# Altium PCB PCB.PcbDoc
Units mm, origin at the board's own origin, x right, y up, seen from the top; angles counter-clockwise.
Board outline 100 x 58 mm, 2 copper layers (Top Layer, Bottom Layer); 42 components, 47 nets, 196 pads, 115 vias.
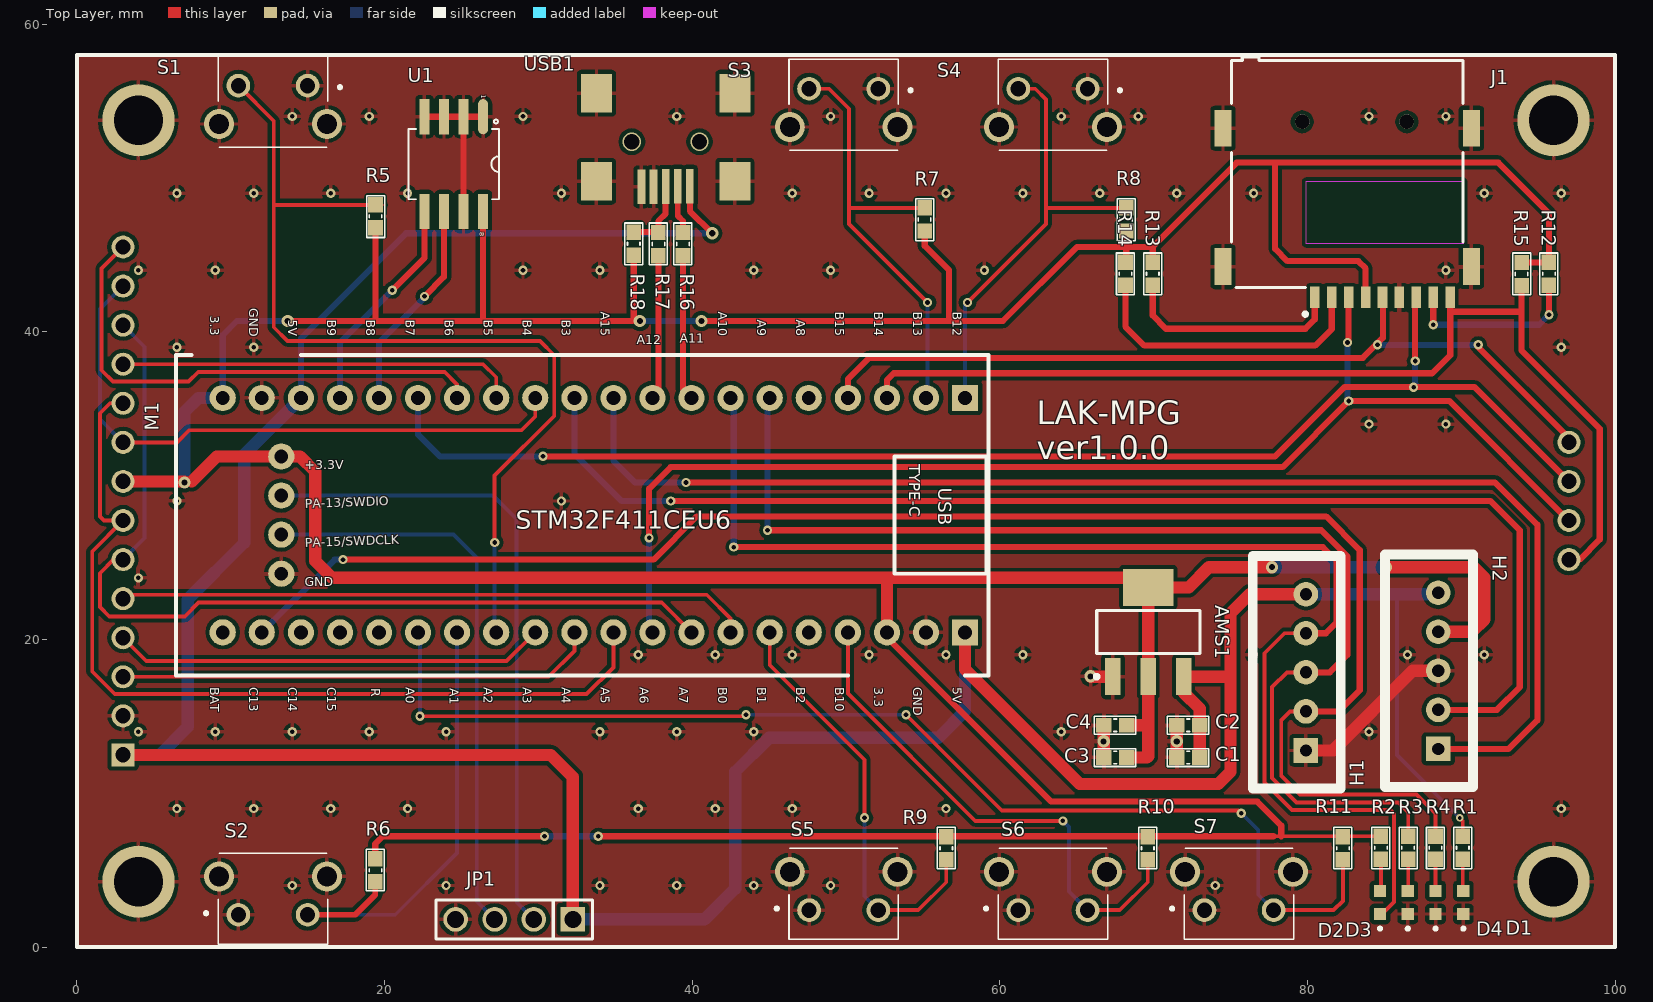
[diagram p0: Top Layer view]
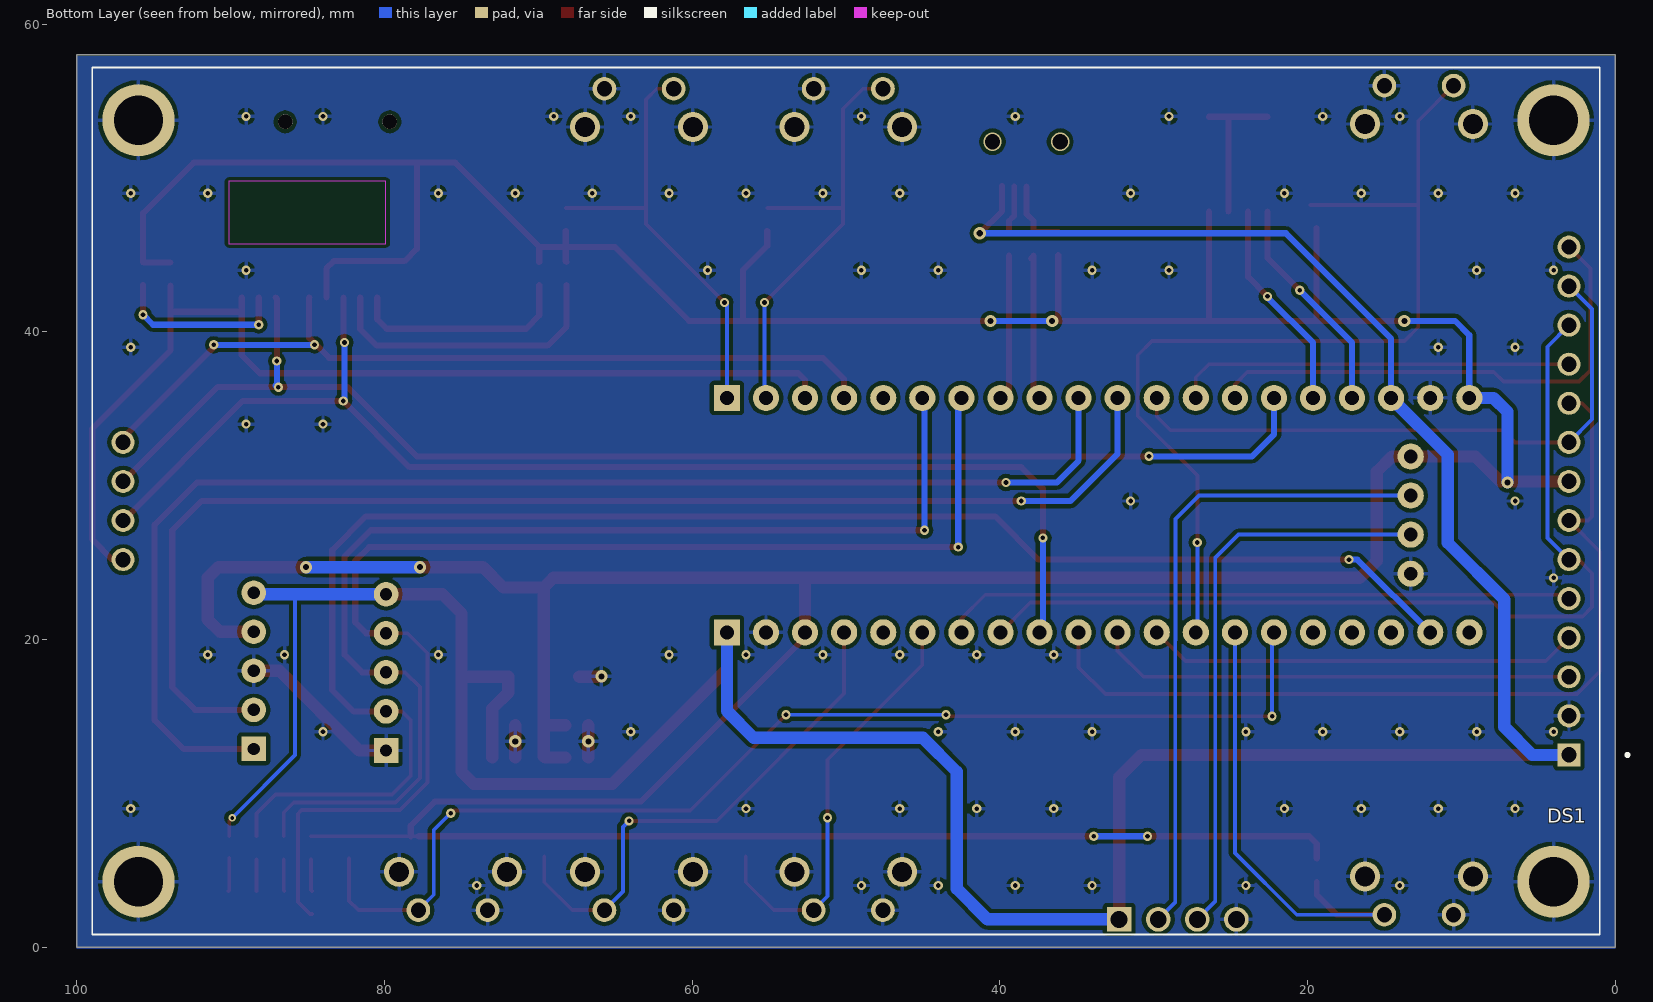
[diagram p1: Bottom Layer view, seen from below]
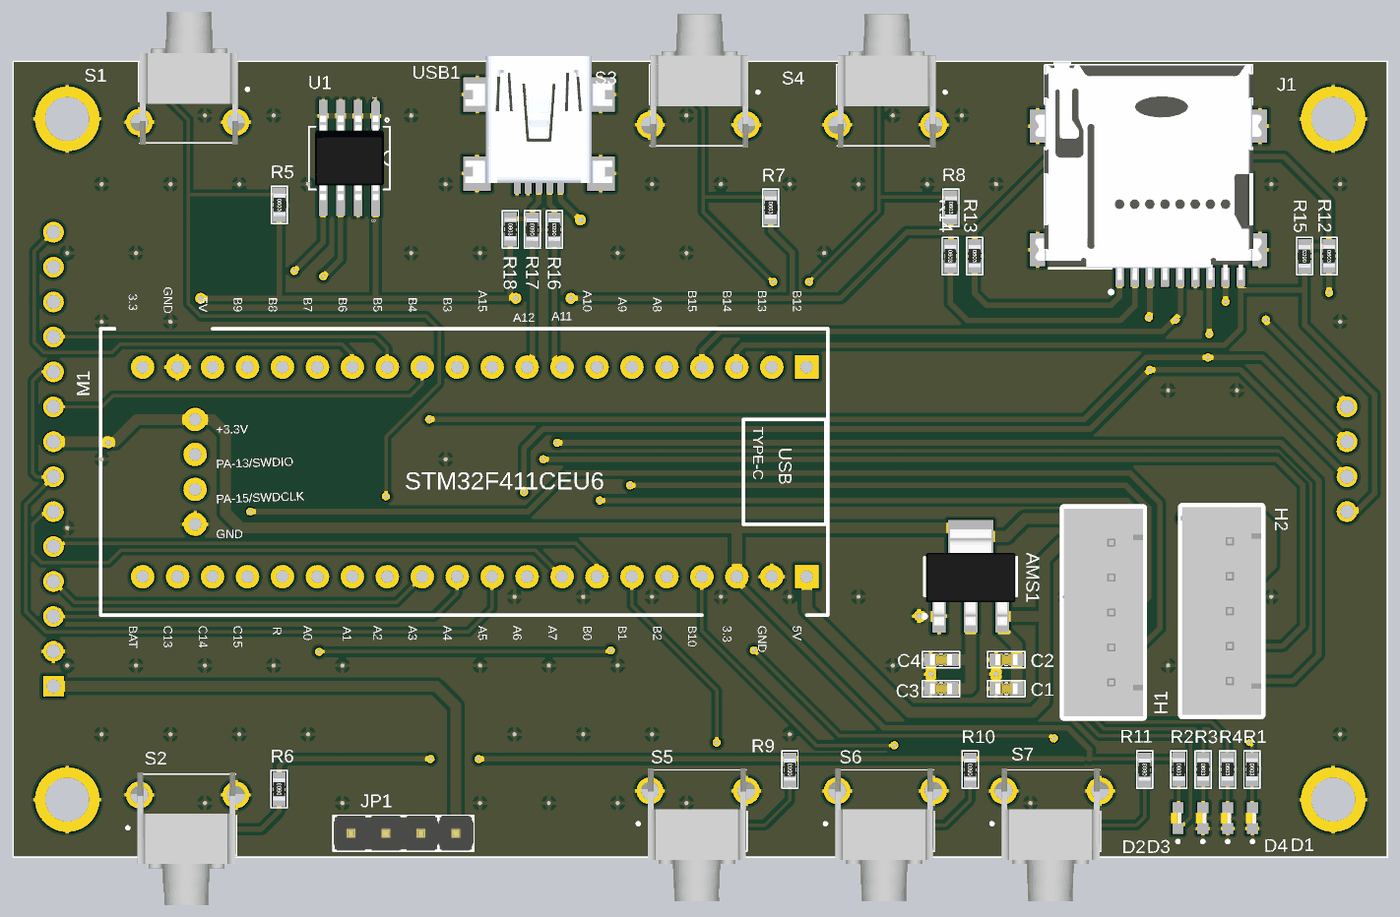
[diagram p2: 3D render of the assembled board from above, using the file's embedded part models]

## Layer stack, top to bottom
Top Solder: solder mask 0.0102, Solder Resist, Dk 3.5
Top Layer: signal copper 0.0356
Dielectric 1: dielectric 0.32, FR-4, Dk 4.8
Bottom Layer: signal copper 0.0356
Bottom Solder: solder mask 0.0102, Solder Resist, Dk 3.5

## Board outline
0,0 0,58 100,58 100,0

## Design rules (kind name [scope] priority, off if disabled: settings)
Clearance [All] p1: gap=0.254 ignorepadtopadclearanceinfootprint=FALSE except(0: Arc-Hole Track-Hole SMDPad-Hole THPad-Hole Via-Hole Fill-Hole Poly-Hole Region-Hole Text-Hole)
DiffPairsRouting [All] p1: maxlimit=0.254 minlimit=0.254 mostfreqgap=0.254 toplayer_minwidth=0.381 toplayer_maxwidth=0.381 toplayer_prefwidth=0.381 bottomlayer_minwidth=0.381 bottomlayer_maxwidth=0.381 bottomlayer_prefwidth=0.381 maxuncoupledlength=12.7
PolygonConnect [All] p1: connectstyle=Relief reliefconductorwidth=0.254 reliefentries=4 polygonreliefangle="90 Angle" airgapwidth=0.254
RoomDefinition Schematic [InComponentClass('Schematic')] p1: confinementstyle=ConfineIn formatcopy=TRUE lockcomponents=FALSE outline 152.943,1.051 181.01,1.051 181.01,56.931 152.943,56.931
RoutingVias [All] p1: holewidth=0.3 width=0.6 viastyle="Through Hole" minholewidth=0.25 minwidth=0.5 maxholewidth=0.4 maxwidth=0.8
SolderMaskExpansion [All] p1: expansion=0.102
Width [All] p1: maxlimit=0.8 minlimit=0.25 preferedwidth=0.4 minimp=50.000000 maximp=50.000000 favimp=50.000000
29 further rules are at their usual default settings.

## Classes and differential pairs
differential pair D: +D_P -D_N
differential pair D1: +D1_P -NetR16_2

## Components (designator, comment, footprint, x,y, rotation, side; value= is the part's Value field where it differs from the comment)
AMS1 "AMS1117-3.3V" SOT223 69.65,20.481 r0 top value="AMS1117-3.3V SOT223"
C1 "106" "tu 0603" 72.25,12.321 r180 top
C2 "104" "tu 0603" 72.25,14.421 r180 top
C3 "106" "tu 0603" 67.5,12.321 r180 top
C4 "104" "tu 0603" 67.5,14.421 r180 top
D1 "VLMO1300-GS08" LED_VLMO1300-GS08 90.134,2.9 r270 top
D2 "VLMO1300-GS08" LED_VLMO1300-GS08 84.716,2.9 r270 top
D3 "VLMO1300-GS08" LED_VLMO1300-GS08 86.522,2.9 r270 top
D4 "VLMO1300-GS08" LED_VLMO1300-GS08 88.328,2.9 r270 top
DS1 "DLS24035B" LCD_DLS24035B 50,29 r90 bottom
H1 "Header 5P 2.54 Duc Thang" XH2.54M-5 79.9,12.78 r90 top
H2 "Header 5P 2.54 Duc Thang" XH2.54M-5 88.5,12.88 r90 top
J1 "MEM2075-00-140-01-A" GCT_MEM2075-00-140-01-A 83.058,53.65 r180 top
JP1 "JP 1x4 2.54" "JP 1x4 DT" 32.24,1.8 r180 top
M1 "STM32F411CEU6 WEACT BLACK PILL V3.0" STM32F411CEU6BP 32.848,28.473 r270 top
R1 "330R" "tro smd 0603" 90.094,6.45 r270 top
R2 "330R" "tro smd 0603" 84.776,6.45 r270 top
R3 "330R" "tro smd 0603" 86.548,6.45 r270 top
R4 "330R" "tro smd 0603" 88.321,6.45 r270 top
R5 "1k" "tro smd 0603" 19.416,47.5 r270 top
R6 "1k" "tro smd 0603" 19.4,5 r90 top
R7 "1k" "tro smd 0603" 55.116,47.3 r270 top
R8 "1k" "tro smd 0603" 68.216,47.3 r270 top
R9 "1k" "tro smd 0603" 56.516,6.425 r90 top
R10 "1k" "tro smd 0603" 69.616,6.425 r90 top
R11 "1k" "tro smd 0603" 82.3,6.425 r90 top
R12 "10k" "tro smd 0603" 95.695,43.775 r270 top
R13 "10k" "tro smd 0603" 69.942,43.775 r270 top
R14 "10k" "tro smd 0603" 68.169,43.775 r270 top
R15 "1k" "tro smd 0603" 93.922,43.75 r90 top
R16 "0R" "tro smd 0603" 39.4,45.7 r90 top
R17 "0R" "tro smd 0603" 37.8,45.7 r90 top
R18 "1.5k" "tro smd 0603" 36.2,45.725 r270 top
S1 "FSMRA4JH04" FSMRA4JH04 15,56 r180 top
S2 "FSMRA4JH04" FSMRA4JH04 10.5,2.1 r0 top
S3 "FSMRA4JH04" FSMRA4JH04 52.1,55.8 r180 top
S4 "FSMRA4JH04" FSMRA4JH04 65.705,55.8 r180 top
S5 "FSMRA4JH04" FSMRA4JH04 47.6,2.4 r0 top
S6 "FSMRA4JH04" FSMRA4JH04 61.205,2.4 r0 top
S7 "FSMRA4JH04" FSMRA4JH04 73.3,2.4 r0 top
U1 "MB85RC256VP" SOIC8_50_328_25X90_SMT 24.5,50.9 r270 top
USB1 "USB Mini 5p SMD" "USB Mini 5p SMD" 38.2,52.9 r0 top

## Footprints (in the part's own frame and the unit in brackets; to place one, negate y for a bottom-side part, rotate by r counter-clockwise, add the part's x,y. Pads: shape width x height; smd on the part's side, far side on the other; paste and mask are expansions set on the pad)
FSMRA4JH04 [mm]
  round 1.54 hole 0.99: 1(0,0) 2(4.5,0)
  round 1.95 hole 1.3: 3(5.755,2.49) 4(-1.255,2.49)
  silkscreen extent -2.2,-1.91 5.8,4.01, body extent -2.05,-5.54 6.36,4.12, height 7.01
GCT_MEM2075-00-140-01-A [mm]
  rect 0.62x1.4 smd paste+0 mask+0.102: P1(2.58,11.42) P2(1.48,11.42) P3(0.38,11.42) P4(-0.72,11.42) P5(-1.82,11.42) P6(-2.92,11.42) P7(-4.02,11.42) P8(-5.12,11.42) P9(-6.22,11.42)
  rect 1.1x2.4 smd paste+0 mask+0.102: SH1(-7.6,0.42) SH2(-7.6,9.42) SH3(8.55,9.42) SH4(8.55,0.42)
  round 0.95 hole 0.95 unplated mask+0: ""(-3.4,0) ""(3.4,0)
  Keep-Out Layer region: 3.15,3.874 -7.057,3.874 -7.057,7.92 3.15,7.92
  silkscreen extent -7.05,-4.23 8,12.62, body extent -7.74,-4.25 8.7,11.6, height 1.45
"JP 1x4 DT" [mm] "4 pins, 1 row, straight, gold plating"
  rect 1.6x1.6 hole 1.1: 1(0,0)
  round 1.6 hole 1.1: 2(2.54,0) 3(5.08,0) 4(7.62,0)
  silkscreen extent -1.27,-1.27 8.89,1.27, body extent -1.27,-1.27 8.89,1.27, height 8.54
LCD_DLS24035B [mm]
  rect 1.5x1.5 / inner round 1.5 / far side rect 1.5x1.5 hole 1 mask+0.102: J2_1(-16.51,-47)
  round 1.5 hole 1 mask+0.102: J2_2(-13.97,-47) J2_3(-11.43,-47) J2_4(-8.89,-47) J2_5(-6.35,-47) J2_6(-3.81,-47) J2_7(-1.27,-47) J2_8(1.27,-47) J2_9(3.81,-47) J2_10(6.35,-47) J2_11(8.89,-47) J2_12(11.43,-47) J2_13(13.97,-47) J2_14(16.51,-47) J4_1(-3.81,47) J4_2(-1.27,47) J4_3(1.27,47) J4_4(3.81,47)
  round 4.7 hole 3.2 mask+0.102: SH1(-24.75,-46) SH2(24.75,-46) SH3(-24.75,46) SH4(24.75,46)
  silkscreen extent -28.17,-50.9 28.17,49
LED_VLMO1300-GS08 [mm]
  rect 0.8x0.8 smd paste+0 mask+0.102: A(-0.75,0) C(0.75,0)
  silkscreen extent 1.6,-0.1 1.8,0.1, body extent -0.4,-0.52 0.4,0.26, height 1.65
SOIC8_50_328_25X90_SMT [mil] "SOIC"
  oval 90x25 smd mask+3: 1(-121.32,75)
  rect 90x25 smd mask+3: 2(-121.32,25) 3(-121.32,-25) 4(-121.32,-75) 5(121.32,-75) 6(121.32,-25) 7(121.32,25) 8(121.32,75)
  silkscreen extent -114,-116 90,116, body extent -121,-98 121,98, height 79
SOT223 [mm]
  rect 1x2.4 smd: 1(-2.3,-2.9) 2(0,-2.9) 3(2.3,-2.9)
  rect 3.3x2.4 smd: 4(0,2.9)
  silkscreen extent -3.47,-3.02 3.35,1.4, body extent -3.25,-3.56 3.25,3.4, height 1.68
STM32F411CEU6BP [mm]
  rect 1.7x1.7 hole 0.9 paste+0 mask+0.102: 1(-7.227,24.892) 40(8.013,24.892)
  round 1.7 hole 0.9 paste+0 mask+0.102: 2(-7.227,22.352) 3(-7.227,19.812) 4(-7.227,17.272) 5(-7.227,14.732) 6(-7.227,12.192) 7(-7.227,9.652) 8(-7.227,7.112) 9(-7.227,4.572) 10(-7.227,2.032) 11(-7.227,-0.508) 12(-7.227,-3.048) 13(-7.227,-5.588) 14(-7.227,-8.128) 15(-7.227,-10.668) 16(-7.227,-13.208) 17(-7.227,-15.748) 18(-7.227,-18.288) 19(-7.227,-20.828) 20(-7.227,-23.368) 21(8.013,-23.368) 22(8.013,-20.828) 23(8.013,-18.288) 24(8.013,-15.748) 25(8.013,-13.208) 26(8.013,-10.668) 27(8.013,-8.128) 28(8.013,-5.588) 29(8.013,-3.048) 30(8.013,-0.508) 31(8.013,2.032) 32(8.013,4.572) 33(8.013,7.112) 34(8.013,9.652) 35(8.013,12.192) 36(8.013,14.732) 37(8.013,17.272) 38(8.013,19.812) 39(8.013,22.352) 41(-3.417,-19.558) 42(-0.877,-19.558) 43(1.663,-19.558) 44(4.203,-19.558)
  silkscreen extent -10.02,-26.42 10.81,26.42
"tro smd 0603" [mm] "Chip Capacitor, 2-Leads, Body 1,60x0,80mm, IPC Medium Density"
  rect 1x0.95 smd mask+0.076: 1(-0.75,0) 2(0.75,0)
  silkscreen extent -1.35,-0.58 1.37,0.58, body extent -0.82,-0.42 0.82,0.43, height 0.44
"tu 0603" [mm] "Chip Capacitor, 2-Leads, Body 1,60x0,80mm, IPC Medium Density"
  rect 1x0.95 smd mask+0.076: 1(-0.75,0) 2(0.75,0)
  silkscreen extent -1.35,-0.58 1.37,0.58, body extent -0.8,-0.4 0.8,0.4, height 0.9
"USB Mini 5p SMD" [mm]
  rect 0.5x2.25 smd: 1(1.651,-3.429) 2(0.864,-3.442) 3(0.076,-3.454) 4(-0.711,-3.467) 5(-1.499,-3.48)
  rect 2x2.5 smd: 5(-4.424,-3.124) 5(-4.42,2.616) 5(4.576,-3.124) 5(4.58,2.616)
  body extent -5.27,-3.8 5.43,5.4, height 3.95
XH2.54M-5 [mm]
  rect 1.6x1.6 hole 0.8: 1(0,0)
  round 1.6 hole 0.8: 2(2.54,0) 3(5.08,0) 4(7.62,0) 5(10.16,0)
  silkscreen extent -2.48,-2.26 12.64,3.46, body extent -2.48,-2.26 12.64,3.48, height 6.91

## Part data
AMS1: library part "AMS1117 SMD", "Dán", Chung_Loai=Dán, Don_Vi=Con, Ma_Hang=MH000596
C1 C3: library part "Tu 0603 106 16V 20%", "Dán", Chung_Loai=Dán, Don_Vi=Con, Ma_Hang=MH004848, So_Chan=2, Ten_Linh_Kien="T? 0603-10uF 20% 16V"
C2 C4: library part "Tu 0603 104 50V 10%", "Dán", Chung_Loai=Dán, Don_Vi=Con, Ma_Hang=MH004568, So_Chan=2, Ten_Linh_Kien="T? 0603 104-100nF 10% 50V"
D1 D2 D3 D4: "Orange 605nm LED Indication - Discrete 2V 0603 (1608 Metric)", Package="0603 Vishay", Check_prices=https://www.snapeda.com/parts/VLMO1300-GS08/Vishay+Semiconductor+Opto+Division/view-part/?ref=eda, MF=Vishay, MP=VLMO1300-GS08, SnapEDA_Link=https://www.snapeda.com/parts/VLMO1300-GS08/Vishay+Semiconductor+Opto+Division/view-part/?ref=snap
DS1: "3.5 Inch 480*320 SPI TFT LCD Module with ILI9488 Driver", Package=None, Check_prices=https://www.snapeda.com/parts/DLS24035B/Elecrow/view-part/?ref=eda, MF=Elecrow, MP=DLS24035B, SnapEDA_Link=https://www.snapeda.com/parts/DLS24035B/Elecrow/view-part/?ref=snap
H1 H2: "C?m", Chung_Loai=C?m, Don_Vi=Con, Ma_Hang=MH001298, Ten_Linh_Kien="Header 5P XH2.54-5P Ð?c Th?ng"
J1: "9 (8 + 1) Position Card Connector microSD Surface Mount, Right Angle Gold", Package=None, Check_prices=https://www.snapeda.com/parts/MEM2075-00-140-01-A/Global+Connector+Technology/view-part/?ref=eda, MF="Global Connector Technology", MP=MEM2075-00-140-01-A, SnapEDA_Link=https://www.snapeda.com/parts/MEM2075-00-140-01-A/Global+Connector+Technology/view-part/?ref=snap
JP1: library part "JP 1x4 2.54 Duc Thang", "C?m", Chung_Loai=C?m, Don_Vi=Con, Ma_Hang=MH000903, Ten_Linh_Kien="Jump Ðon Ð?c 2.54MM 1x40P Th?ng 11MM"
R1 R2 R3 R4: library part "Tro 0603 5% 330R", "Dán", Chung_Loai=Dán, Don_Vi=Con, Ma_Hang=MH006910, So_Chan=2, Ten_Linh_Kien="Tr? 0603 5% 330R"
R5 R6 R7 R8 R9 R10 R11 R15: library part "Tro 0603 1% 1k", "Dán", Chung_Loai=Dán, Don_Vi=Con, Ma_Hang=MH006334, So_Chan=2, Ten_Linh_Kien="Tr? 0603 1% 1k"
R12 R13 R14: library part "Tro 0603 1% 10k", "Dán", Chung_Loai=Dán, Don_Vi=Con, Ma_Hang=MH006333, So_Chan=2, Ten_Linh_Kien="Tr? 0603 1% 10k"
R16 R17: library part "Tro 0603 1% 0R", "Dán", Chung_Loai=Dán, Don_Vi=Con, Ma_Hang=MH005792, So_Chan=2, Ten_Linh_Kien="Tr? 0603 1% 0R"
R18: library part "Tro 0603 5% 1.5k", "Dán", Chung_Loai=Dán, Don_Vi=Con, Ma_Hang=MH006313, So_Chan=2, Ten_Linh_Kien="Tr? 0603 5% 1.5k"
S1 S2 S3 S4 S5 S6 S7: "Switch,Pushbutton, Tactile, Single Pole, 50mA,Right Angle", Package=None, Check_prices=https://www.snapeda.com/parts/FSMRA4JH04/TE+Connectivity/view-part/?ref=eda, MF="TE Connectivity", MP=FSMRA4JH04, SnapEDA_Link=https://www.snapeda.com/parts/FSMRA4JH04/TE+Connectivity/view-part/?ref=snap
U1: library part IC_MB85RC256VPF-G-JNERE2, "FRAM (Ferroelectric RAM) Memory IC 256Kb (32K x 8) I²C 1MHz 550ns 8-SOP", Alternate Part Number-1=NA, Case/Package=SOIC8, Manufacturer=Fujitsu, Manufacturer Part Number=MB85RC256VPF-G-JNERE2, Supplier Part Number-1=C126728, Supplier-1=LCSC
USB1: "USB Type B", Ma_Hang=MH001022, Ten="MiniUSB 5P SMD"

## Via types
v1: diameter 0.6, hole 0.3, Top Layer to Bottom Layer, 102 vias
v2: diameter 0.8, hole 0.4, Top Layer to Bottom Layer, 10 vias
v3: diameter 1.2, hole 1, Top Layer to Bottom Layer, 2 vias
v4: diameter 0.5, hole 0.25, Top Layer to Bottom Layer, 1 vias

## Nets (pads, with @x,y where several pads share a name; then routed paths per layer and width w, separated by ;. In a path a pad name is that pad's centre, name@x,y a point inside that pad or via, vN(x,y) a via of type N, cw(c..) or ccw(c..) an arc to the next point about the centre after c; other vN are vias at no path point)
3.3V: AMS1.2 AMS1.4 C3.1 C4.1 DS1.J2_8 H2.4 J1.P4 M1.20 M1.38 M1.41 R2.1 R5.2 R6.2 R7.2 R8.2 R9.2 R10.2 R11.2 R12.1 R13.1 R14.1 R15.2 R18.2 U1.8 | length 367.3
  Top Layer w0.25: 77.8,7.2 78.3,7.2 R2.1
  Top Layer w0.4: v2(13.7,40.7) 19.416,40.7 ; R6.2 19.4,6.7 19.9,7.2 v1(30.4,7.2) ; R5.2 19.416,40.7 ; U1.8 26.405,40.795 26.5,40.7 ; v1(33.9,7.2) 77.8,7.2 ; R18.2 36.2,40.8 36.1,40.7 26.5,40.7 ; v2(40.6,40.7) 56.7,40.7 ; M1.38 52.66,20.14 63.342,9.458 76.742,9.458 78.3,7.9 78.3,7.2 ; R7.2 55.116,45.584 56.7,44 56.7,40.7 ; R14.1 68.216,44.573 68.216,45.51 ; R8.2 68.216,45.51 ; R13.1 69.942,45.542 ; J1.P4 83.778,44.122 83.3,44.6 78.7,44.6 77.9,45.4 77.9,51 ; R15.2 95.67,44.5 R12.1 95.695,47.705 92.4,51 77.9,51 ; 19.416,40.7 26.5,40.7 ; 56.7,40.7 60.2,40.7 65.01,45.51 68.216,45.51 ; 68.216,45.51 69.91,45.51 69.942,45.542 ; 69.942,45.542 75.4,51 77.9,51
  Top Layer w0.8: DS1.J2_8 v2@7,30.27 ; 7.47,30.27 9.09,31.89 M1.41 14.51,31.89 15.5,30.9 15.5,25.1 16.6,24 52.66,24 ; M1.38 52.66,24 ; C3.1 69.571,12.321 69.65,12.4 69.65,14.4 ; C4.1 69.629,14.421 69.65,14.4 ; v2(77.7,24.7) 73.6,24.7 72.281,23.381 AMS1.4 ; v2(85.1,24.7) 90.8,24.7 91.5,24 91.5,21.3 90.7,20.5 H2.4 ; 52.66,24 69.031,24 AMS1.4 ; 69.65,14.4 AMS1.2 AMS1.4
  Bottom Layer w0.4: M1.20 9.48,39.78 10.4,40.7 v2(13.7,40.7) ; v1(30.4,7.2) v1(33.9,7.2) ; v2(36.6,40.7) v2(40.6,40.7)
  Bottom Layer w0.8: v2(7,30.2) 7,34.8 7.9,35.7 M1.20 ; v2(77.7,24.7) v2(85.1,24.7)
5V: AMS1.3 C1.1 C2.1 DS1.J2_1 H1.5 H2.5 JP1.1 M1.18 M1.40 R1.1 USB1.1 | length 220.2
  Top Layer w0.25: v4(89.9,8.4) 90.094,8.206 R1.1
  Top Layer w0.4: USB1.1 39.851,47.849 v2(41.3,46.4)
  Top Layer w0.8: DS1.J2_1 30.81,12.49 32.24,11.06 JP1.1 ; M1.40 57.74,18.06 65.2,10.6 74.2,10.6 75,11.4 75,17.7 ; C1.1 C2.1 73,15.5 71.95,16.55 AMS1.3 74.881,17.581 75,17.7 ; H1.5 76.24,22.94 75,21.7 75,17.7
  Bottom Layer w0.25: 86.2,22.94 85.821,22.561 85.821,12.479 v4(89.9,8.4)
  Bottom Layer w0.4: M1.18 14.56,39.56 21.4,46.4 v2(41.3,46.4)
  Bottom Layer w0.8: DS1.J2_1 5.39,12.49 7.2,14.3 7.2,22.6 10.88,26.28 10.88,32.02 M1.18 ; JP1.1 40.8,1.8 42.8,3.8 42.8,11.4 45,13.6 56,13.6 57.74,15.34 M1.40 ; H1.5 86.2,22.94 88.4,22.94 H2.5
A: H2.1 M1.10 | length 85.8
  Top Layer w0.4: v1(39.6,30.2) 92.2,30.2 94.946,27.454 94.946,14.746 93.08,12.88 H2.1
  Bottom Layer w0.4: M1.10 34.88,31.62 36.3,30.2 v1(39.6,30.2)
B: H2.2 M1.11 | length 83.3
  Top Layer w0.4: v1(38.6,29) 38.608,29.008 91.892,29.008 93.8,27.1 93.8,16.9 92.32,15.42 H2.2
  Bottom Layer w0.4: M1.11 32.34,32.06 35.4,29 v1(38.6,29)
CD: DS1.J4_1 J1.P9 M1.3 R15.1 | length 68
  Top Layer w0.4: M1.3 52.66,36.86 53.1,37.3 88.1,37.3 89.278,38.478 89.278,41.3 ; J1.P9 89.278,41.3 ; R15.1 93.922,41.3 ; DS1.J4_1 97.69,25.19 99,26.5 99,33.7 93.922,38.778 93.922,41.3 ; 89.278,41.3 93.922,41.3
CK: DS1.J4_4 J1.P5 M1.4 | length 55.2
  Top Layer w0.4: M1.4 50.12,36.92 51.5,38.3 83.6,38.3 v1@84.55,39.25 ; v1(84.55,39.15) v1@84.55,39.25 ; J1.P5 84.9,42.208 84.9,39.6 v1@84.55,39.25 ; v1(91.1,39.15) 91.1,39 97,33.1 DS1.J4_4
  Bottom Layer w0.4: v1(84.55,39.15) v1(91.1,39.15)
CMD: DS1.J4_2 J1.P3 M1.32 | length 81.6
  Top Layer w0.4: v1(37.2,26.6) 37.2,29.8 38.6,31.2 78.378,31.2 v1(82.678,35.5) 89.23,35.5 DS1.J4_2 ; v1(82.6,39.3) 82.678,39.378 J1.P3
  Bottom Layer w0.4: v1(37.2,26.6) 37.2,20.68 M1.32 ; v1(82.6,39.3) 82.6,35.578 v1(82.678,35.5)
D0: DS1.J4_3 J1.P7 M1.15 | length 88.2
  Top Layer w0.4: v1(30.3,31.9) 77.9,31.9 82.4,36.4 v1(86.9,36.4) 90.87,36.4 DS1.J4_3 ; v1(87,38.1) 87,42.152 J1.P7
  Bottom Layer w0.4: M1.15 22.18,33.32 23.6,31.9 v1(30.3,31.9) ; v1(86.9,36.4) 86.978,36.4 87.078,36.5 87,36.578 v1(87,38.1)
D1_P: R17.2 R18.1 USB1.3 | length 4.8
  Top Layer w0.381: R18.1 37.775,46.475 R17.2 37.8,47.2 38.276,47.676 USB1.3
D_N: M1.8 R16.1 | length 9.5
  Top Layer w0.381: R16.1 39.4,36.26 M1.8
D_P: M1.9 R17.1 | length 9.7
  Top Layer w0.381: M1.9 37.8,36.08 R17.1 R17.1@37.99,44.76
GND: AMS1.1 C1.2 C2.2 C3.2 C4.2 D1.C D3.C D4.C DS1.J2_2 DS1.SH1 DS1.SH2 DS1.SH3 DS1.SH4 H1.1 H2.3 J1.P6 J1.SH1 J1.SH2 J1.SH3 J1.SH4 JP1.4 M1.19 M1.39 M1.44 S1.1 S1.3 S1.4 S2.1 S2.3 S2.4 S3.1 S3.3 S3.4 S4.1 S4.3 S4.4 S5.1 S5.3 S5.4 S6.1 S6.3 S6.4 S7.1 S7.3 S7.4 U1.1 U1.2 U1.3 U1.4 U1.7 USB1.4 USB1.5 | length 26.4
  Top Layer w0.4: U1.4 U1.1 ; U1.7 U1.2
  Top Layer w0.8: v2(65.9,17.6) 65.919,17.581 AMS1.1 ; C3.2 v2(66.75,13.371) C4.2 ; C1.2 v2(71.5,13.371) C2.2 ; H1.1 81.658,12.78 86.838,17.96 H2.3
  other v1: 14,4 24,4 34,4 39,4 44,4 49,4 74,4 6.5,9 11.5,9 16.5,9 21.5,9 36.5,9 41.5,9 46.5,9 56.5,9 96.5,9 4,14 9,14 14,14 19,14 24,14 34,14 39,14 44,14 64,14 84,14 36.5,19 41.5,19 46.5,19 51.5,19 56.5,19 61.5,19 76.5,19 86.5,19 91.5,19 4,24 6.5,29 31.5,29 84,34 89,34 6.5,39 11.5,39 96.5,39 4,44 9,44 29,44 34,44 44,44 49,44 59,44 89,44 6.5,49 11.5,49 16.5,49 21.5,49 31.5,49 46.5,49 51.5,49 56.5,49 61.5,49 66.5,49 71.5,49 76.5,49 91.5,49 96.5,49 14,54 19,54 29,54 39,54 49,54 64,54 69,54 84,54 89,54
L-BTN: M1.27 R6.1 S2.2 | length 31.5
  Top Layer w0.381: S2.2 18.1,2.1 19.4,3.4 R6.1
  Bottom Layer w0.25: S2.2 20.7,2.1 24.72,6.12 M1.27
LD-BTN: M1.35 R9.1 S5.2 | length 27.8
  Top Layer w0.25: M1.35 45.04,18.34 51.2,12.18 v1(51.2,8.4) ; S5.2 54.7,2.4 56.516,4.216 R9.1 R9.1@56.516,5.9
  Bottom Layer w0.25: v1(51.2,8.4) 51.2,3.3 S5.2
LU-BTN: M1.37 R10.1 S6.2 | length 34.2
  Top Layer w0.25: M1.37 50.12,16.48 58.404,8.196 64.096,8.196 v1(64.1,8.2) ; S6.2 67.8,2.4 69.616,4.216 R10.1 R10.1@69.616,5.9
  Bottom Layer w0.25: v1(64.1,8.2) 64.5,7.8 64.5,3.605 S6.2
MPG_EN: H1.2 M1.22 R4.1 | length 106.6
  Top Layer w0.25: H1.2 78.87,15.32 78.3,14.75 78.3,11.113 79.505,9.908 87.1,9.908 88.321,8.687 R4.1
  Top Layer w0.4: v1(17.3,25.19) 37.49,25.19 40.3,28 81.21,28 83.4,25.81 83.4,16.7 82.02,15.32 H1.2
  Bottom Layer w0.4: M1.22 16.75,25.19 v1(17.3,25.19)
NetD1_A: D1.A R1.2 | length 2.2
  Top Layer w0.25: R1.2@90.094,5.8 90.094,3.69 D1.A
NetD2_A: D2.A R2.2 | length 2.1
  Top Layer w0.25: D2.A 84.776,3.71 R2.2
NetD3_A: D3.A R3.2 | length 2.1
  Top Layer w0.25: D3.A 86.548,3.677 R3.2
NetD4_A: D4.A R4.2 | length 2.1
  Top Layer w0.25: R4.2 88.321,3.657 D4.A
NetJ1_P1: J1.P1 R13.2 | length 14.5
  Top Layer w0.4: R13.2 69.942,41.058 70.8,40.2 79.87,40.2 80.478,40.808 J1.P1
NetJ1_P2: J1.P2 R14.2 | length 19.1
  Top Layer w0.4: R14.2 68.169,40.331 69.4,39.1 80.5,39.1 81.578,40.178 J1.P2
NetJ1_P8: J1.P8 R12.2 | length 11.5
  Top Layer w0.4: v1(88.178,40.452) J1.P8 ; R12.2 95.7,43.021 v1(95.7,41.1)
  Bottom Layer w0.4: v1(88.178,40.452) 95.052,40.452 v1(95.7,41.1)
NetR16_2: R16.2 USB1.2 | length 3.1
  Top Layer w0.381: USB1.2 39.064,47.536 39.4,47.2 R16.2
PA0: M1.26 R11.1 S7.2 | length 76.4
  Top Layer w0.25: v1(22.3,15) 43.4,15 v1(43.5,15.1) ; v1(53.9,15.1) 60.121,8.879 75.521,8.879 v1(75.7,8.7) ; S7.2@77.701,2.499 S7.2 81.7,2.4 82.3,3 R11.1 R11.1@82.3,5.75
  Bottom Layer w0.25: M1.26 22.3,20.34 v1(22.3,15) ; v1(43.5,15.1) v1(53.9,15.1) ; v1(75.7,8.7) 76.8,7.6 76.8,3.4 S7.2
PA2: M1.28 R5.1 S1.2 | length 62.3
  Top Layer w0.25: S1.2 12.8,53.7 12.8,48.2 ; R5.1@19.816,48.25 R5.1 12.85,48.25 12.8,48.2 ; v1(27.16,26.3) 27.16,30.66 31.029,34.529 31.029,38.471 30.1,39.4 13.69,39.4 12.8,40.29 12.8,48.2
  Bottom Layer w0.25: v1(27.16,26.3) 27.16,20.56 M1.28
PA3: DS1.J2_4 M1.29 | length 28.2
  Top Layer w0.25: DS1.J2_4 4.51,18.6 27.94,18.6 M1.29
PA4: DS1.J2_3 M1.30 | length 31.3
  Top Layer w0.25: DS1.J2_3 30.67,17.57 32.34,19.24 M1.30
PA5: DS1.J2_7 DS1.J2_10 M1.31 | length 58.2
  Top Layer w0.25: DS1.J2_10 2.15,35.35 1.5,34.7 1.5,28 1.77,27.73 DS1.J2_7 0.996,25.726 0.996,17.904 2.459,16.441 33.141,16.441 34.88,18.18 M1.31
PA7: DS1.J2_6 DS1.J2_12 M1.33 | length 60.4
  Top Layer w0.25: DS1.J2_6 2.39,25.19 1.5,24.3 1.5,22.1 2.1,21.5 7.011,21.5 7.907,22.396 38.024,22.396 M1.33
  Bottom Layer w0.25: DS1.J2_6 4.4,26.59 4.4,39.03 DS1.J2_12
PA8: M1.5
PA9: H1.3 M1.6 R3.1 | length 76.5
  Top Layer w0.25: H1.3 78.66,17.86 77.704,16.904 77.704,10.996 79.296,9.404 85.9,9.404 86.548,8.756 R3.1
  Top Layer w0.4: v1(44.9,27.1) 80.9,27.1 82.6,25.4 82.6,19 81.46,17.86 H1.3
  Bottom Layer w0.4: v1(44.9,27.1) 44.9,35.56 M1.6
PA10: D2.C H1.4 M1.7 | length 83.5
  Top Layer w0.25: H1.4 78.5,20.4 77.2,19.1 77.2,10.7 79,8.9 85.4,8.9 85.63,8.67 85.63,2.93 84.85,2.15 D2.C
  Top Layer w0.4: v1(42.7,26) 81,26 81.9,25.1 81.9,21.1 81.2,20.4 H1.4
  Bottom Layer w0.4: M1.7 42.7,35.5 v1(42.7,26)
PA13: JP1.2 M1.42 | length 43.2
  Top Layer w0.25: JP1.2@29.749,2.351 JP1.2@30.3,1.8
  Bottom Layer w0.25: M1.42 27.05,29.35 28.571,27.829 28.571,19.951 28.6,19.922 28.6,2.9 JP1.2
PA14: JP1.3 M1.43 | length 37.4
  Top Layer w0.25: JP1.3 JP1.3@27.229,1.869
  Bottom Layer w0.25: M1.43 24.49,26.81 26,25.3 26,2.96 JP1.3
PB0: DS1.J2_5 M1.34 | length 41.1
  Top Layer w0.25: DS1.J2_5 3.25,22.9 40.95,22.9 42.5,21.35 M1.34
PB2: M1.36
PB4: DS1.J2_9 DS1.J2_13 M1.12 | length 40.1
  Top Layer w0.25: DS1.J2_9 6.51,32.81 7.3,33.6 28.9,33.6 29.8,34.5 M1.12
  Bottom Layer w0.25: DS1.J2_9 1.5,34.31 1.5,41.47 DS1.J2_13
PB5: DS1.J2_11 M1.13 | length 26
  Top Layer w0.25: DS1.J2_11 26.41,37.89 27.26,37.04 M1.13
PB6: DS1.J2_14 M1.14 | length 33.5
  Top Layer w0.25: DS1.J2_14 1.6,44.11 1.6,37.5 2.339,36.761 7.261,36.761 7.886,37.386 23.914,37.386 24.72,36.58 M1.14
PB8: M1.16 U1.6 | length 13.9
  Top Layer w0.381: U1.6@23.865,47 U1.6
  Top Layer w0.4: v1(22.6,42.3) 23.865,43.565 U1.6@23.865,47
  Bottom Layer w0.4: M1.16 19.64,39.292 22.6,42.252 v1(22.6,42.3)
PB9: M1.17 U1.5 | length 14.4
  Top Layer w0.381: U1.5@22.595,46.9 U1.5
  Top Layer w0.4: v1(20.5,42.7) 22.595,44.795 U1.5@22.595,46.9
  Bottom Layer w0.4: M1.17 17.1,39.3 v1(20.5,42.7)
PB12: M1.1 R8.1 S4.2 | length 29
  Top Layer w0.25: v1(57.9,41.9) 63,47 63,48.05 ; S4.2 62.3,55.8 63,55.1 63,48.1 ; R8.1 63.05,48.05 ; 63,48.05 63.05,48.05 ; 63,48.05 63,48.1 ; 63,48.1 63.05,48.05
  Bottom Layer w0.25: M1.1 57.74,41.74 v1(57.9,41.9)
PB13: M1.2 R7.1 S3.2 | length 29
  Top Layer w0.25: S3.2 48.9,55.8 50.2,54.5 50.2,48.1 ; R7.1 50.25,48.05 50.2,48.1 ; v1(55.3,41.9) 50.2,47 50.2,48.1
  Bottom Layer w0.25: M1.2 55.3,35.8 v1(55.3,41.9)
PC14: M1.23
PC15: M1.24
RST: M1.25
pads on no net: J1. M1.21
copper on no net:
  other v3: 36.076,52.356 40.476,52.356

## Polygon pours and split planes (outlines as drawn)
GND on Top Layer "Top Layer-No Net" (solid, remove dead copper, pour order 0): 0,58 100,58 100,0 0,0
GND on Bottom Layer "Top Layer-No Net" (solid, remove dead copper, pour order 2): 0,57.9 100,57.9 100,-0.1 0,-0.1

## Silkscreen, mask and mechanical layers (free items; w line width, h text height)
Top Overlay:
  the board outline again, w0.254
  text "LAK-MPG / ver1.0.0" at 62.387,31.7 h1.52

## Text inside footprints (layer, text, board x,y; h text height)
M1: Top Overlay "A11" at 39.2,39.1 h1; Top Overlay "PA-13/SWDIO" at 14.831,28.342 h1 r2; Top Overlay "STM32F411CEU6" at 28.53,26.81 h2.03; Top Overlay "TYPE-C" at 53.838,31.382 h1.2 r270; Top Overlay "GND" at 14.814,23.262 h1; Top Overlay "PA-15/SWDCLK" at 14.831,25.802 h1 r2; Top Overlay "+3.3V" at 14.814,30.882 h1; Top Overlay "USB" at 55.72,29.858 h1.5 r270; Top Overlay "B12" at 56.732,41.288 h1 r270; Top Overlay "B13" at 54.192,41.288 h1 r270; Top Overlay "B14" at 51.652,41.288 h1 r270; Top Overlay "B15" at 49.112,41.288 h1 r270; Top Overlay "A8" at 46.572,40.78 h1 r270; Top Overlay "A9" at 44.032,40.78 h1 r270; Top Overlay "A10" at 41.492,41.288 h1 r270; Top Overlay "A12" at 36.4,39 h1; Top Overlay "A15" at 33.872,41.288 h1 r270; Top Overlay "B3" at 31.332,40.78 h1 r270; Top Overlay "B4" at 28.792,40.78 h1 r270; Top Overlay "B5" at 26.252,40.78 h1 r270; Top Overlay "B6" at 23.712,40.78 h1 r270; Top Overlay "B7" at 21.172,40.78 h1 r270; Top Overlay "B8" at 18.632,40.78 h1 r270; Top Overlay "B9" at 16.092,40.78 h1 r270; Top Overlay "5V" at 13.552,40.78 h1 r270; Top Overlay "GND" at 11.012,41.542 h1 r270; Top Overlay "3.3" at 8.472,41.034 h1 r270; Top Overlay "5V" at 56.732,16.904 h1 r270; Top Overlay "GND" at 54.192,16.904 h1 r270; Top Overlay "3.3" at 51.652,16.904 h1 r270; Top Overlay "B10" at 49.112,16.904 h1 r270; Top Overlay "B2" at 46.572,16.904 h1 r270; Top Overlay "B1" at 44.032,16.904 h1 r270; Top Overlay "B0" at 41.492,16.904 h1 r270; Top Overlay "R" at 18.951,16.831 h1 r270; Top Overlay "A7" at 38.952,16.904 h1 r270; Top Overlay "A6" at 36.412,16.904 h1 r270; Top Overlay "A5" at 33.872,16.904 h1 r270; Top Overlay "A4" at 31.332,16.904 h1 r270; Top Overlay "A3" at 28.792,16.904 h1 r270; Top Overlay "A2" at 26.252,16.904 h1 r270; Top Overlay "A1" at 24.031,16.831 h1 r270; Top Overlay "A0" at 21.172,16.904 h1 r270; Top Overlay "C15" at 16.092,16.904 h1 r270; Top Overlay "C14" at 13.552,16.904 h1 r270; Top Overlay "C13" at 11.012,16.904 h1 r270; Top Overlay "BAT" at 8.472,16.904 h1 r270
U1: Top Overlay "1" at 26.202,55.421 h0.51 r270; Top Overlay "8" at 26.1,46.455 h0.51 r270